# Altium PCB Sound_Sensor_v3.2.PcbDoc (part 3 of 3)
Units mil, origin at the board's own origin, x right, y up, seen from the top; angles counter-clockwise.
Board outline 2755.7 x 2687.13 mil, 2 copper layers (Top Layer, Bottom Layer), stack 57 mil thick; 77 components, 57 nets, 290 pads, 84 vias.
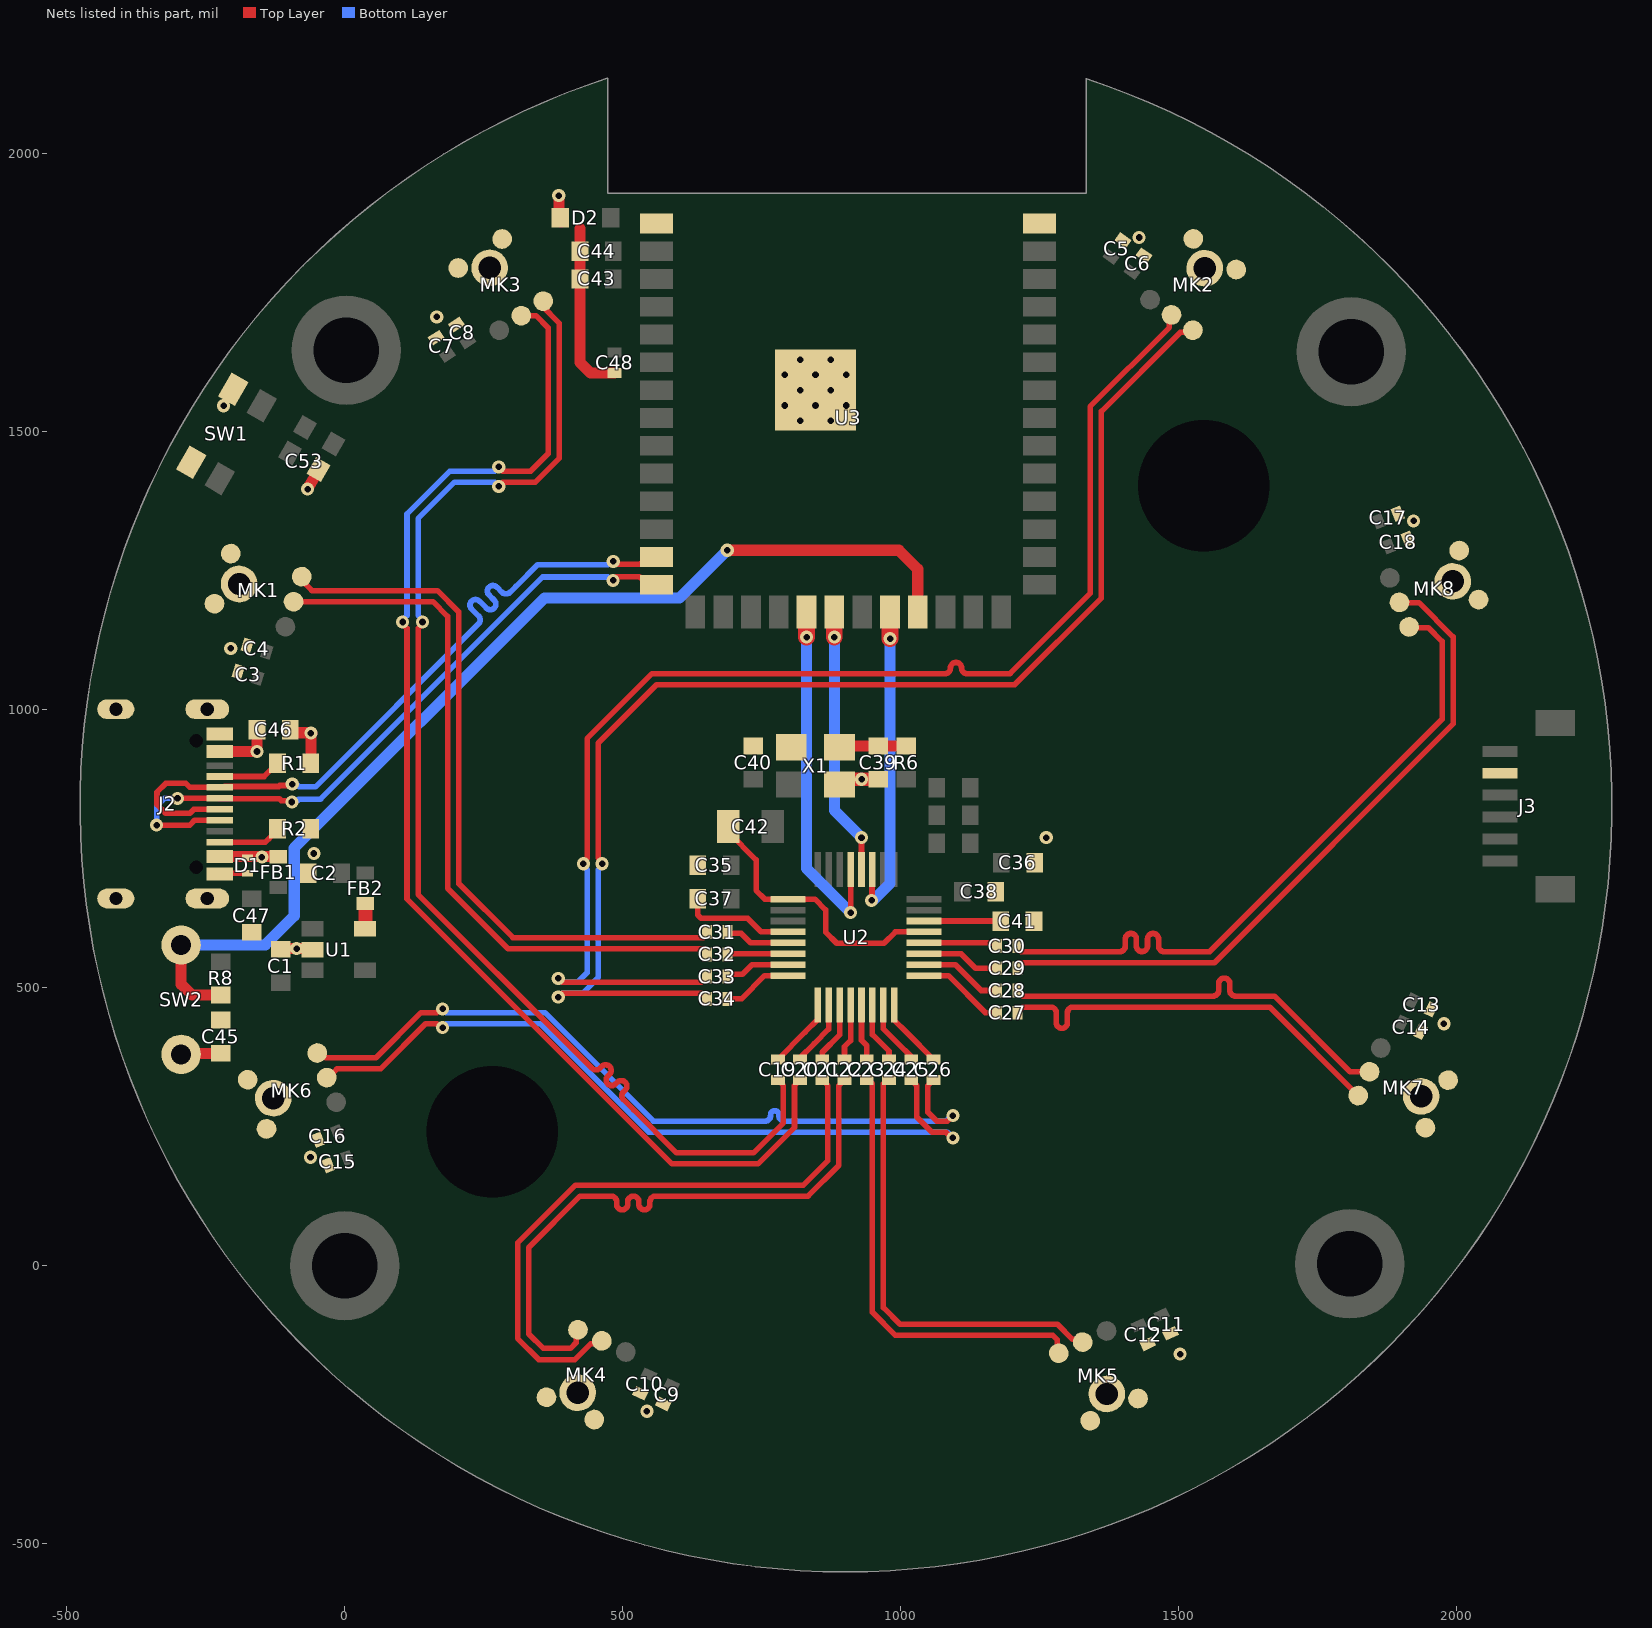
[diagram p2: the nets of this part, all layers, seen from the top]

## Via types
v1: diameter 23.62, hole 11.81, Top Layer to Bottom Layer, 84 vias

## Nets (pads, with @x,y where several pads share a name; then routed paths per layer and width w, separated by ;. In a path a pad name is that pad's centre, name@x,y a point inside that pad or via, vN(x,y) a via of type N, cw(c..) or ccw(c..) an arc to the next point about the centre after c; other vN are vias at no path point) (continued)
GND: C1.2 C2.2 C3.2 C4.2 C5.2 C6.2 C7.2 C8.2 C9.2 C10.2 C11.2 C12.2 C13.2 C14.2 C15.2 C16.2 C17.2 C18.2 C35.2 C36.2 C37.2 C38.2 C39.1 C40.1 C41.2 C42.1 C43.2 C44.2 C45.1 C46.2 C47.2 C48.1 C53.2 D1.1 D2.2 J2.A1/B12 J2.B1/A12 J2.S1 J2.S2 J2.S3 J2.S4 J3.2 MK1.2 MK1.3 MK1.4 MK2.2 MK2.3 MK2.4 MK3.2 MK3.3 MK3.4 MK4.2 MK4.3 MK4.4 MK5.2 MK5.3 MK5.4 MK6.2 MK6.3 MK6.4 MK7.2 MK7.3 MK7.4 MK8.2 MK8.3 MK8.4 R1.1 R2.1 SW1.2 SW2.2 U1.2 U2.13 U2.25 U2.28 U3.1 U3.40 U3.41 X1.2 X1.4 | length 1506.1
  Top Layer w10: J2.B1/A12@-224.87,704.8 -223.45,706.22 D1.1@-175,706.22 ; C47.2@-167.32,599.92 C47.2@-165.04,599.92 ; C1.2@-125,579 C1.2@-115,569 ; R2.1@-71,776 R2.1@-61,786 ; C37.2@635,660 635,630.86 640.86,625 724.55,625 749.16,600.39 U2.28@797.64,600.39 ; C42.1@690,790 690,780 740,730 740,675 755.55,659.45 U2.25@797.64,659.45 845.55,659.45 865,640 865,600 885,580 970,580 990.39,600.39 U2.13@1041.73,600.39 ; U3.41@845,1575 U3.41@846.46,1575
  Top Layer w20: SW2.2@-294.33,380.02 -292.35,382 C45.1@-223,382 ; C1.2@-115,569 -113.52,570.48 v1(-86.7,570.48) -59.89,570.48 U1.2@-57.99,568.58 ; C46.2@-97.95,964.25 -97.95,963.69 -92.95,958.69 -61.69,958.69 v1(-61,958) ; C2.2@-71,711 C2.2@-66,706 ; v1(-67,1397) -50.6,1425.41 C53.2@-47.02,1432 ; R1.1@-61,904 -61,955.02 -59,957.02 v1@-59,958 ; D2.2@382.72,1885 382.72,1883.03 D2.2@388.47,1877.28 ; v1(385,1925) 385.69,1924.31 385.69,1887.03 D2.2@387.72,1885 ; 423,1865.57 C44.2@423,1825 C43.2@423,1775 423,1625 442.28,1605.72 C48.1@485.5,1605.72 ; X1.2@802.15,933.76 X1.2@803.39,932.52
  Top Layer w25: X1.4@890,865.59 899.41,875 v1(929.7,875) C39.1@960,875
  other v1: 543.53,-261.94 1502.81,-159 -61.73,195.1 1977.23,435.21 -55.51,741.51 1262,770 -205.1,1110.58 1922.79,1339.79 819.23,1519.88 874.35,1519.88 -218,1547 791.67,1547.44 846.79,1547.44 901.91,1547.44 819.23,1575 874.35,1575 791.67,1602.56 846.79,1602.56 901.91,1602.56 819.23,1630.12 874.35,1630.12 165.53,1706.94 1428.94,1849.63
GPIO21: C45.2 R8.1 SW2.1 U3.23 | length 1932.9
  Top Layer w20: SW2.1@-294.33,576.87 -294.33,506.33 -275,487 R8.1@-223,487 ; v1(688,1287) 997,1287 1030.71,1253.29 U3.23@1030.71,1175.79
  Bottom Layer w20: SW2.1@-295.27,570.87 SW2.1@-294.33,570.87 ; SW2.1@-294.33,576.87 -143.13,576.87 -91,629 -91,751 359,1201 602,1201 v1(688,1287)
MIC_OUTS.OUT1_N: C32.1 MK1.6 | length 1295
  Top Layer w10: MK1.6@-92.14,1194.52 158.48,1194.52 185,1168 185,679 294,570 508.4,570 645,570 651.5,563.5 C32.1@651.5,560
MIC_OUTS.OUT1_P: C31.1 MK1.1 | length 1294.6
  Top Layer w10: MK1.1@-77.49,1239.6 -77.49,1233.01 -59,1214.52 166.77,1214.52 205,1176.28 205,687.28 302.28,590 508.4,590 573.03,590 645,590 651.5,596.5 C31.1@651.5,600
MIC_OUTS.OUT2_N: C33.1 MK2.6 | length 2361.2
  Top Layer w10: v1(384,516.81) 390.81,510 641.5,510 C33.1@651.5,520 ; v1(429.38,723) 429.38,726.69 436,733.31 436,948.28 552.72,1065 1074.58,1065 1079.58,1065 ccw(c1079.58,1075) 1089.58,1075 1089.58,1075.17 cw(c1099.58,1075.17) 1109.58,1075.17 1109.58,1075 ccw(c1119.58,1075) 1119.58,1065 1167,1065 1196.72,1065 1341,1209.28 1341,1545.27 1483.55,1687.82 1483.55,1706.74 MK2.6@1487.23,1710.42
  Bottom Layer w10: v1(384,516.81) 390.81,510 419,510 436.19,527.19 436.19,712.5 429.38,719.31 v1(429.38,723)
MIC_OUTS.OUT2_P: C34.1 MK2.1 | length 2362.6
  Top Layer w10: v1(384,483.19) 390.81,490 641.5,490 C34.1@651.5,480 ; v1(463,723) 463,726.69 456,733.69 456,940 561,1045 1205,1045 1361,1201 1361,1536.98 1503.23,1679.21 1522.14,1679.21 MK2.1@1525.82,1682.89
  Bottom Layer w10: v1(384,483.19) 390.81,490 427.28,490 456.19,518.9 456.19,712.5 463,719.31 v1(463,723)
MIC_OUTS.OUT3_N: C20.1 MK3.6 | length 2299.1
  Top Layer w10: v1(104,1158) 104,1154.31 111.91,1146.41 111.91,659.81 588.72,183 743.28,183 809,248.72 809,324 C20.1@819,334 ; v1(277,1437) 284.5,1429.5 334.5,1429.5 366,1461 366,1687.03 343.88,1709.15 MK3.6@317.61,1709.15
  Bottom Layer w10: v1(104,1158) 104,1161.69 111.91,1169.59 111.91,1352.19 189.22,1429.5 269.5,1429.5 v1(277,1437)
MIC_OUTS.OUT3_P: C19.1 MK3.1 | length 2293.2
  Top Layer w10: v1(139.81,1158) 139.81,1154.31 131.91,1146.41 131.91,668.09 413.71,386.29 444.8,355.2 ccw(c451.87,362.27) 458.94,355.2 462.14,358.4 cw(c469.21,351.33) 476.28,358.4 cw(c469.21,351.33) 476.28,344.26 473.08,341.06 ccw(c480.15,333.99) 473.08,326.92 ccw(c480.15,333.99) 487.22,326.92 490.42,330.12 cw(c497.49,323.05) 504.57,330.12 cw(c497.49,323.05) 504.57,315.97 501.37,312.78 ccw(c508.44,305.7) 501.37,298.63 519.04,280.96 597,203 735,203 789,257 789,324 C19.1@779,334 ; v1(277,1402) 284.5,1409.5 342.78,1409.5 386,1452.72 386,1695.31 MK3.1@353.55,1727.76
  Bottom Layer w10: v1(139.81,1158) 139.81,1161.69 131.91,1169.59 131.91,1343.91 197.5,1409.5 269.5,1409.5 v1(277,1402)
MIC_OUTS.OUT4_N: C21.1 MK4.6 | length 1121.6
  Top Layer w10: MK4.6@462.46,-135.28 457.59,-140.15 442.85,-140.15 414.04,-168.96 348.96,-168.96 311,-131 311,41 415,145 454,145 825,145 869,189 869,324 C21.1@859,334
MIC_OUTS.OUT4_P: C22.1 MK4.1 | length 1121.1
  Top Layer w10: MK4.1@419.5,-115.25 416.35,-118.4 416.35,-138.37 405.75,-148.96 357.25,-148.96 331,-122.72 331,32.72 423.28,125 454,125 479,125 cw(c479,115) 489,115 489,110.43 ccw(c499,110.43) 509,110.43 509,115 cw(c519,115) 529,115 529,110.43 ccw(c539,110.43) 549,110.43 549,115 cw(c559,115) 559,125 591.42,125 833.28,125 889,180.72 889,324 C22.1@899,334
MIC_OUTS.OUT5_N: C24.1 MK5.6 | length 810.4
  Top Layer w10: C24.1@979,334 975.5,334 969,327.5 969,-75.58 998.82,-105.4 1282.04,-105.4 1309.26,-132.62 1322.54,-132.62 MK5.6@1327.4,-137.49 MK5.6@1316.82,-137.49
MIC_OUTS.OUT5_P: C23.1 MK5.1 | length 802.6
  Top Layer w10: C23.1@939,334 942.5,334 949,327.5 949,-83.86 990.53,-125.4 1273.75,-125.4 1282.03,-133.67 1282.03,-155.1 MK5.1@1284.44,-157.52
MIC_OUTS.OUT6_N: C25.1 MK6.6 | length 1408.4
  Top Layer w10: MK6.6@-32.56,338.32 -29.71,338.32 -13.99,354.04 64.35,354.04 145.5,435.19 165.5,435.19 172.31,428.38 v1(176,428.38) ; C25.1@1019,334 1029,324 1029,267.72 1056.72,240 1081.33,240 1091.33,230 v1(1094,230)
  Bottom Layer w10: v1(176,428.38) 182.81,435.19 351.81,435.19 547,240 1084,240 v1(1094,230)
MIC_OUTS.OUT6_P: C26.1 MK6.1 | length 1411.8
  Top Layer w10: MK6.1@-49.55,382.57 -42.67,382.57 -34.13,374.04 56.07,374.04 137.22,455.19 165.5,455.19 172.31,462 v1(176,462) ; C26.1@1059,334 1049,324 1049,276 1065,260 1084,260 v1(1094,270)
  Bottom Layer w10: v1(176,462) 182.81,455.19 360.1,455.19 555.28,260 738.67,260 756,260 ccw(c756,270) 766,270 766,271.29 cw(c773.5,271.29) 781,271.29 781,270 ccw(c791,270) 791,260 811,260 1081.33,260 1091.33,270 v1(1094,270)
MIC_OUTS.OUT7_N: C28.1 MK7.6 | length 741.5
  Top Layer w10: C28.1@1210,495 1220,485 1557.14,485 1562.15,485 ccw(c1562.15,495) 1572.15,495 1572.15,507.34 cw(c1582.15,507.34) 1592.15,507.34 1592.15,495 ccw(c1602.15,495) 1602.15,485 1621,485 1672.3,485 1808.51,348.79 MK7.6@1843.42,348.79
MIC_OUTS.OUT7_P: C27.1 MK7.1 | length 741.9
  Top Layer w10: C27.1@1210,455 1220,465 1245,465 1270,465 cw(c1270,455) 1280,455 1280,436.95 ccw(c1290,436.95) 1300,436.95 1300,455 cw(c1310,455) 1310,465 1340.08,465 1664.02,465 MK7.1@1823.01,306
MIC_OUTS.OUT8_N: C29.1 MK8.6 | length 1247
  Top Layer w10: C29.1@1210,535 1210,538.5 1216.5,545 1499.05,545 1564.28,545 1994,974.72 1994,1131.28 1932.52,1192.77 1897.88,1192.77 MK8.6@1897.42,1193.22
MIC_OUTS.OUT8_P: C30.1 MK8.1 | length 1249.2
  Top Layer w10: C30.1@1210,575 1210,571.5 1216.5,565 1372.6,565 1394.05,565 ccw(c1394.05,575) 1404.05,575 1404.05,587.55 cw(c1414.05,587.55) 1424.05,587.55 1424.05,575 ccw(c1434.05,575) 1444.05,575 1444.05,587.55 cw(c1454.05,587.55) 1464.05,587.55 1464.05,575 ccw(c1474.05,575) 1474.05,565 1499.05,565 1556,565 1974,983 1974,1123 1949.11,1147.89 1916.03,1147.89 MK8.1@1914.79,1149.12
MISO: U2.20 U3.20 | length 483.4
  Top Layer w10: U2.20@929.53,712.6 v1(929.53,770)
  Top Layer w30: v1(880.71,1130.71) U3.20@880.71,1175.79
  Bottom Layer w20: v1(880.71,1130.71) 880.71,818.82 v1(929.53,770)
MOSI: U2.21 U3.19 | length 650.8
  Top Layer w10: v1(909.84,635.16) U2.21@909.84,712.6
  Top Layer w30: v1(830.71,1130.71) U3.19@830.71,1175.79
  Bottom Layer w20: v1(830.71,1130.71) 830.71,714.29 v1(909.84,635.16)
NetC19_2: C19.2 U2.1 | length 127.2
  Top Layer w10: C19.2@779,371 828,420 850.79,442.79 U2.1@850.79,468.5
NetC20_2: C20.2 U2.2 | length 118.8
  Top Layer w10: C20.2@819,371 819,374 845,400 870.47,425.47 U2.2@870.47,468.5
NetC21_2: C21.2 U2.3 | length 110.4
  Top Layer w10: C21.2@859,371 859,384 890.16,415.16 U2.3@890.16,468.5
NetC22_2: C22.2 U2.4 | length 102
  Top Layer w10: C22.2@899,371 899,394 909.84,404.84 U2.4@909.84,468.5
NetC23_2: C23.2 U2.5 | length 101.4
  Top Layer w10: U2.5@929.53,468.5 929.53,405.47 939,396 C23.2@939,371
NetC24_2: C24.2 U2.6 | length 109.8
  Top Layer w10: U2.6@949.21,468.5 949.21,415.79 979,386 C24.2@979,371
NetC25_2: C25.2 U2.7 | length 118.3
  Top Layer w10: U2.7@968.9,468.5 968.9,426.1 994.5,400.5 1019,376 C25.2@1019,371
NetC26_2: C26.2 U2.8 | length 126.7
  Top Layer w10: U2.8@988.58,468.5 988.58,441.42 1010,420 C26.2@1059,371
NetC27_2: C27.2 U2.9 | length 158.9
  Top Layer w10: U2.9@1041.73,521.65 1085.85,521.65 1152.5,455 C27.2@1173,455
NetC28_2: C28.2 U2.10 | length 150.5
  Top Layer w10: U2.10@1041.73,541.34 1098.66,541.34 1145,495 C28.2@1173,495
NetC29_2: C29.2 U2.11 | length 142
  Top Layer w10: U2.11@1041.73,561.02 1108.98,561.02 1135,535 C29.2@1173,535
NetC30_2: C30.2 U2.12 | length 133.6
  Top Layer w10: U2.12@1041.73,580.71 1167.29,580.71 C30.2@1173,575
NetC31_2: C31.2 U2.29 | length 117.1
  Top Layer w10: C31.2@688.5,600 690.65,597.85 713.2,597.85 730.34,580.71 U2.29@797.64,580.71
NetC32_2: C32.2 U2.30 | length 109.6
  Top Layer w10: C32.2@688.5,560 689.52,561.02 U2.30@797.64,561.02
NetC33_2: C33.2 U2.31 | length 118.1
  Top Layer w10: C33.2@688.5,520 688.5,520.2 692.5,524.2 715.48,524.2 732.62,541.34 U2.31@797.64,541.34
NetC34_2: C34.2 U2.32 | length 126.4
  Top Layer w10: C34.2@688.5,480 713.78,480 755.43,521.65 U2.32@797.64,521.65
NetC39_2: C39.2 R6.2 X1.1 | length 124.9
  Top Layer w20: X1.1@890,932.52 cw(c892.48,932.52) 892.48,935 C39.2@960,935 R6.2@1010,935 R6.2@1007.52,937.48
NetFB2_1: FB2.1 U1.5 | length 35.2
  Top Layer w15: U1.5@37,606.49 U1.5@36.5,605.98 U1.5@37.48,605
  Top Layer w25: U1.5@37,606.49 FB2.1@37,639.63
NetJ2_A5: J2.A5 R1.2 | length 115.3
  Top Layer w10: J2.A5@-224.87,879.99 -145.01,879.99 -133.5,891.5 -131,891.5 -121,901.5 R1.2@-121,904
NetJ2_B5: J2.B5 R2.2 | length 115.3
  Top Layer w10: J2.B5@-224.87,761.88 -142.69,761.88 -136.08,768.5 -136,768.5 -121,783.5 R2.2@-121,786
REFIN: C41.1 U2.14 | length 138.3
  Top Layer w10: U2.14@1041.73,620.08 1179.92,620.08 C41.1@1180,620
SCLK: U2.19 U3.22 | length 589.6
  Top Layer w10: v1(947.75,657.25) 948.48,657.98 948.48,711.87 U2.19@949.21,712.6
  Top Layer w30: v1@980.71,1128.3 U3.22@980.71,1175.79
  Bottom Layer w20: v1(947.75,657.25) 948.44,657.94 951.15,657.94 981.01,687.8 v1(981.01,1128.01)
USB.USB_N: J2.A7 J2.B7 U3.13 | length 1331.9
  Top Layer w10: J2.A7@-224.87,820.94 -271.69,820.94 -278.74,813.88 -322.11,813.88 -337.81,829.58 -337.81,851.79 -322.11,867.5 -285.94,867.5 -278.75,860.31 J2.B7@-224.87,860.31 ; J2.B7@-216.4,862 -118.68,862 -116.88,863.8 -97.16,863.8 v1(-94.56,866.41) ; v1(483,1267) 488.36,1261.64 531.28,1261.64 531.92,1262.28 548.31,1262.28 U3.13@561.02,1275
  Bottom Layer w10: v1(-94.56,866.41) -91.95,863.8 -84.42,863.8 -81.89,861.27 -67.75,861.27 -52.84,861.27 237.05,1151.17 240.59,1154.7 ccw(c233.52,1161.77) 240.59,1168.84 228.1,1181.34 cw(c235.17,1188.41) 228.1,1195.48 cw(c235.17,1188.41) 242.24,1195.48 254.73,1182.99 ccw(c261.8,1190.06) 268.87,1182.99 ccw(c261.8,1190.06) 268.87,1197.13 259.42,1206.58 cw(c266.5,1213.65) 259.42,1220.72 cw(c266.5,1213.65) 273.57,1220.72 283.02,1211.27 ccw(c290.09,1218.34) 297.16,1211.27 307.85,1221.96 346.8,1260.91 473.22,1260.91 479.31,1267 v1(483,1267)
USB.USB_P: J2.A6 J2.B6 U3.14 | length 1237.9
  Top Layer w10: v1(-338.46,792.64) -278.77,792.64 -270.16,801.25 J2.B6@-224.87,801.25 ; v1@-301,840.62 J2.A6@-224.87,840.62 ; J2.A6@-224.87,840 -117.52,840 -114.26,836.74 -97.8,836.74 v1(-95.19,834.13) ; v1(482.8,1232.82) 489.62,1239.64 530,1239.64 531.92,1237.72 548.31,1237.72 U3.14@561.02,1225
  Bottom Layer w10: v1(-338.46,792.64) -338.46,826.54 -324.31,840.69 v1(-301,840.69) ; v1(-95.19,834.13) -92.58,836.74 -85.05,836.74 -82.52,839.27 -58.63,839.27 -43.73,839.27 355.91,1238.91 473.02,1238.91 479.11,1232.82 v1(482.8,1232.82)
VBUS: C46.1 D1.2 FB1.1 J2.A4/B9 J2.B4/A9 | length 211.5
  Top Layer w10: J2.B4/A9@-224.87,736.29 J2.B4/A9@-224.73,736.15
  Top Layer w20: J2.A4/B9@-224.87,925.27 -224.74,925.13 -158.09,925.13 v1(-157.95,925) C46.1@-157.95,964.25 ; J2.B4/A9@-224.73,736.15 -120.59,736.15 FB1.1@-120,735.56
  other v1: -149,735.07
pads on no net: J2.A8 J2.B8 J2.MH J3.MP1 J3.MP2 U1.4 U2.27 U3.4 U3.5 U3.6 U3.7 U3.8 U3.9 U3.10 U3.11 U3.12 U3.15 U3.16 U3.24 U3.25 U3.26 U3.28 U3.29 U3.30 U3.31 U3.32 U3.33 U3.34 U3.35 U3.38 U3.39

## Polygon pours and split planes (outlines as drawn)
no net on Bottom Overlay "NONET_L-01_P-001" (solid): 929.91,-91.12 ccw(c1058.2,98.34) 830,115 851.98,112.93 cw(c1058.2,98.34) 955.48,-81.07
no net on Bottom Overlay "NONET_L-01_P-001" (solid): 812.18,246.93 cw(c688.63,-156.04) 1100.18,-65.07 cw(c1461.05,-199.89) 1220.4,100.93 1220.18,101.93 1206.06,221.93 1112.12,121.93 1111.18,120.93 ccw(c301.36,-522.4) 898.68,321.93
GND on Bottom Layer "GND_L02_P002" (solid, remove dead copper, pour order 2): 450,2105.87 ccw(c901.69,827.06) 1355,2105.29 1355,1910 450,1910
GND on Top Layer "GND_L01_P003" (solid, remove dead copper, pour order 3): 451,2105.22 ccw(c902.69,826.41) 1356,2104.65 1356,1910 451,1910

## Other copper
Top Layer:
  rectangle net 3V3: 1114,707.5 1199,878
  rectangle net GND: 1156,658.54 1256,687
  rectangle net \R\E\S\E\T\: 1043,712.6 1080,777.5
  rectangle net 3V3: 2023.07,915.35 2109.78,1074
  region net 3V3: -65.33,1154.59 -118.63,1171.91 -159.92,1044.85 -106.61,1027.53
  rectangle net 3V3: -148.28,1048.18 -101.31,1108.06
  rectangle net GND: 1225,602.5 1298,793
  rectangle net GPIO21: -240.5,427 -205.5,487
  rectangle net 5V: -184.82,644.92 -101,674.92
  region net "DEBUG SIG.ENABLE": -159.19,1494.44 -190.21,1512.35 -236.19,1432.71 -205.17,1414.8
  region net "DEBUG SIG.ENABLE": -48.34,1518.75 -151.75,1578.45 -254.36,1400.72 -150.95,1341.02
  region net GND: 1965.98,214.39 2025.04,338.2 1912.48,391.89 1853.42,268.08
  region net GND: 1985.05,385.36 2012.94,443.83 1957.21,470.41 1929.32,411.94
  region net 3V3: 1872.74,366.87 1929.45,485.76 1877.07,510.74 1820.36,391.86
  region net GND: -22.82,173.67 -46.86,236.3 -87.82,220.58 -63.77,157.95
  region net 3V3: 68.81,207.59 22.19,329.04 -40.97,304.79 5.65,183.35
  region net 3V3: 1477.15,1745.8 1371.17,1821.39 1337.97,1774.84 1443.95,1699.25
  rectangle net 3V3: -21,688.5 53,762
  region net GND: 330.26,-257.59 453.3,-314.96 480.23,-257.21 357.19,-199.83
  region net 3V3: 478.53,-166.95 596.14,-221.79 624.05,-161.94 506.44,-107.1
  region net 3V3: 1362.64,-143.39 1481.22,-88.09 1453.31,-28.24 1334.73,-83.54
  region net 3V3: 1906.05,1228.33 1858.28,1349.59 1790.66,1322.95 1838.43,1201.69
  region net 3V3: 282.96,1707.53 174.95,1636.03 215.06,1575.43 323.08,1646.92
  rectangle net GND: 366.98,1865.57 434,1902.72
  rectangle net GND: -81,688.5 -46,803.5
  rectangle net 5V: -135.75,642 -101,692.25
  rectangle net GND: -235,652.83 -217.75,697
  region net GND: 1468.56,1843.67 1415.16,1881.76 1389.78,1846.17 1443.18,1808.08
  region net GND: 1948.42,1312.27 1923.83,1374.69 1887.36,1360.33 1911.95,1297.91
  region net GND: 1451.63,-178.94 1512.43,-150.59 1494.45,-112.04 1433.65,-140.39
  region net GND: 2042.12,1242.79 2037.07,1255.6 1960.71,1225.52 1965.75,1212.71
  region net GND: 393.84,-259.61 411.43,-267.81 441.1,-204.18 423.51,-195.98
  region net GND: -215.67,1573.1 -281.6,1458.91 -262.36,1447.81 -196.43,1562
  region net "DEBUG SIG.ENABLE": -163.39,1540.22 -229.32,1426.03 -214.72,1417.6 -148.79,1531.79
  rectangle net GND: -235,964.57 -217.75,1003.83
  region net GND: -207.37,1134.8 -228.1,1071 -189.66,1058.51 -168.93,1122.31
  region net GND: 507.53,-258.94 566.08,-286.25 583.08,-249.79 524.53,-222.49
  region net GND: 1335.97,-318.63 1460.3,-260.66 1407.59,-147.63 1283.27,-205.61
  region net GND: -213.81,342.25 -164.65,214.18 -48.23,258.87 -97.38,386.94
  region net GND: -231.68,1308.39 -272.89,1181.53 -154.29,1142.99 -113.07,1269.85
  region net GND: 2078.1,1191.52 2028.35,1317.83 1951.99,1287.75 2001.74,1161.44
  region net GND: 282.15,1886.94 167.76,1811.23 236.59,1707.23 350.98,1782.94
  region net GND: 180.53,1741.15 128.01,1706.39 159.4,1658.96 211.92,1693.72
  region net GND: 1640.34,1806.83 1528.66,1886.49 1456.77,1785.7 1568.44,1706.04
  rectangle net 5V: -135.75,605.98 -11,667
  rectangle net 5V: -115,494 -11,524.26
Bottom Layer:
  rectangle net VBUS: -234,714 -127,950

## Silkscreen, mask and mechanical layers (free items; w line width, h text height)
Top Overlay:
  lines w5: -202,377.5 -182.5,377.5 -175,385 -175,393 ; -168.34,563 -168.34,579.92 ; -144.62,1053.42 -78.97,1050.85 ; -123,663 -123,649 -101,649 ; -115,490 -115,465 -50,465 ; -103,205 -106.88,214.7 -63.37,231.6 ; -54,685 -18,685 ; -54,727 -40,727 -18,727 ; -53.33,807 -54,807 -54,837 -4,837 ; -46,131 -18,142 -26.6,164.64 ; -27,730 -27,775 -7,775 ; 350,1860 350,1825 404,1825 ; 427.5,1914 427.5,1938 ; 490,1735 490,1754 ; 596,667 616,667 616,660 ; 613,608 639,608 639,600 ; 624,556 639,556 639,560 ; 627,514 639,514 639,520 ; 660,855 685,855 685,824 686,824 ; 701,480 723,480 723,457 ; 731,309 731,331.5 763,331.5 ; 859,321.5 861,321.5 861,193 ; 939,321.5 941,321.5 941,193 ; 1026.08,305 1026.08,321.5 ; 1058,321.5 1059,321.5 ; 1075,331.5 1106,331.5 ; 1129.08,881 1130,881 1130,895 1160,895 ; 1143,768.52 1160,768.52 ; 1143,822.39 1159,822.39 ; 1222.5,530 1360,530 ; 1222.5,566.34 1222.5,565 1237,565
  lines w10: 2005,629.3 2235,629.3 2235,1023 2005,1023 2005,629.3
  text "USB" at -405.98,1031.47 h90
  text "DEBUG" at 1995.4,674.3 h90 r90
Bottom Overlay:
  lines w5: 1111.18,120.93 ccw(c301.36,-522.4) 898.68,321.93 812.18,246.93 cw(c688.63,-156.04) 1100.18,-65.07 cw(c1461.05,-199.89) 1220.4,100.93 ; 1112.12,121.93 1206.06,221.93 1220.18,101.93 ; 830,115 cw(c1058.2,98.34) 929.91,-91.12 955.48,-81.07 ccw(c1058.2,98.34) 851.98,112.93 830,115
  text "RoHS" at 981.68,12.97 h236.22
  text "compliant" at 978.68,-68.26 h125.98
  text "ZERO CARBON FOOTPRINT" at 1324.68,-192.07 h40
  text "Sound_Sensor_v3.2" at 1249,-257 h40
DIMENSION:
  lines w5: -885,1793 -217.85,1801.54 -88.9,1705.92 ; -118.08,1705.92 -88.9,1705.92 ; -97.88,1733.72 -88.9,1705.92
  text "Mounting Hole" at -2378.28,1920.59 h236.22
  text "Dia 3.0 (mm)" at -2197.38,1753.62 h118.11
  text "PCB Diameter" at -2378.28,262.59 h236.22
BOARD OUTLINE:
  the board outline again, w10
FABRICATION:
  drawing of 416 lines, arcs and shapes, not listed
  text "Layer" at 3239.58,3283.09 h60
  text "Name" at 3649.49,3283.09 h60
  text "Material" at 4579.23,3283.09 h60
  text "Thickness" at 5439,3283.09 h60
  text "Constant" at 6088.83,3283.09 h60
  text "Board Layer Stack" at 6658.7,3283.09 h60
  text "Top Overlay" at 3649.49,3163.09 h60
  text "Top Solder" at 3649.49,3043.09 h60
  text "Solder Resist" at 4579.23,3043.09 h60
  text "3.00mil" at 5439,3043.09 h60
  text "3.5" at 6088.83,3043.09 h60
  text "1" at 3239.58,2923.09 h60
  text "Top Layer" at 3649.49,2923.09 h60
  text "10.00mil" at 5439,2923.09 h60
  text "Dielectric 1" at 3649.49,2803.09 h60
  text "FR-4" at 4579.23,2803.09 h60
  text "37.00mil" at 5439,2803.09 h60
  text "4.8" at 6088.83,2803.09 h60
  text "2" at 3239.58,2683.09 h60
  text "Bottom Layer" at 3649.49,2683.09 h60
  text "10.00mil" at 5439,2683.09 h60
  text "Bottom Solder" at 3649.49,2563.09 h60
  text "Solder Resist" at 4579.23,2563.09 h60
  text "3.00mil" at 5439,2563.09 h60
  text "3.5" at 6088.83,2563.09 h60
  text "Bottom Overlay" at 3649.49,2443.09 h60
Drill Drawing:
  circle w10: c-1355.38,4135.27 r33.33
  lines w10: -1388.71,3968.61 -1372.04,3968.61 -1372.04,3951.94 -1338.71,3951.94 -1338.71,3968.61 -1322.04,3968.61 -1322.04,4001.94 -1338.71,4001.94 -1338.71,4018.61 -1372.04,4018.61 -1372.04,4001.94 -1388.71,4001.94 -1388.71,3968.61 ; -1388.71,4251.94 -1322.04,4251.94 -1322.04,4318.61 -1388.71,4318.61 -1388.71,4251.94 ; -1388.71,4468.61 -1322.04,4468.61 -1355.38,4401.94 -1388.71,4468.61 ; -1388.71,4551.94 -1355.38,4568.61 -1322.04,4551.94 -1338.71,4585.27 -1322.04,4618.61 -1355.38,4601.94 -1388.71,4618.61 -1372.04,4585.27 -1388.71,4551.94 ; -1388.71,4701.94 -1388.71,4718.61 -1372.04,4735.27 -1388.71,4751.94 -1388.71,4768.61 -1372.04,4768.61 -1355.38,4751.94 -1338.71,4768.61 -1322.04,4768.61 -1322.04,4751.94 -1338.71,4735.27 -1322.04,4718.61 -1322.04,4701.94 -1338.71,4701.94 -1355.38,4718.61 -1372.04,4701.94 -1388.71,4701.94 ; -1388.71,4885.27 -1355.38,4851.94 -1322.04,4885.27 -1355.38,4918.61 -1388.71,4885.27 ; -1388.71,5001.94 -1322.04,5001.94 -1322.04,5068.61 -1388.71,5068.61 -1388.71,5001.94 ; -1375.38,5015.27 -1335.38,5015.27 -1335.38,5055.27 -1375.38,5055.27 -1375.38,5015.27
  lines w15: -1448.5,3906.94 12079.68,3906.94 ; -1448.5,5106.94 12079.68,5106.94 ; -897.62,3756.94 -897.62,5256.94 ; -307.78,3756.94 -307.78,5256.94 ; 851.88,3756.94 851.88,5256.94 ; 1357.76,3756.94 1357.76,5256.94 ; 2091.56,3756.94 2091.56,5256.94 ; 3591.11,3756.94 3591.11,5256.94 ; 4180.96,3756.94 4180.96,5256.94 ; 4926.76,3756.94 4926.76,5256.94 ; 6066.42,3756.94 6066.42,5256.94 ; 6920.19,3756.94 6920.19,5256.94 ; 8253.79,3756.94 8253.79,5256.94 ; 9587.4,3756.94 9587.4,5256.94 ; 10677.08,3756.94 10677.08,5256.94 ; -1448.5,3756.94 12079.68,3756.94 12079.68,5256.94 -1448.5,5256.94 -1448.5,3756.94
  text "Symbol" at -1358.5,5151.94 h72
  text "Count" at -852.62,5151.94 h72
  text "Hole Size" at -262.78,5151.94 h72
  text "Plated" at 896.88,5151.94 h72
  text "Hole Type" at 1402.76,5151.94 h72
  text "Drill Layer Pair" at 2136.56,5151.94 h72
  text "Via/Pad" at 3636.11,5151.94 h72
  text "Pad Shape" at 4225.96,5151.94 h72
  text "Template" at 4971.76,5151.94 h72
  text "Description" at 6111.42,5151.94 h72
  text "Hole Tolerance (+)" at 6965.19,5151.94 h72
  text "Hole Tolerance (-)" at 8298.79,5151.94 h72
  text "Hole Length" at 9632.4,5151.94 h72
  text "Routed Path Length" at 10722.08,5151.94 h72
  text "2" at -852.62,5001.94 h60
  text "23.62mil (0.600mm)" at -262.78,5001.94 h60
  text "PTH" at 896.88,5001.94 h60
  text "Slot" at 1402.76,5001.94 h60
  text "Top Layer - Bottom Layer" at 2136.56,5001.94 h60
  text "Pad" at 3636.11,5001.94 h60
  text "Rounded" at 4225.96,5001.94 h60
  text "r90_170h60_140r100" at 4971.76,5001.94 h60
  text "55.12mil (1.400mm)" at 9632.4,5001.94 h60
  text "31.50mil (0.800mm)" at 10722.08,5001.94 h60
  text "2" at -852.62,4851.94 h60
  text "23.62mil (0.600mm)" at -262.78,4851.94 h60
  text "PTH" at 896.88,4851.94 h60
  text "Slot" at 1402.76,4851.94 h60
  text "Top Layer - Bottom Layer" at 2136.56,4851.94 h60
  text "Pad" at 3636.11,4851.94 h60
  text "Rounded" at 4225.96,4851.94 h60
  text "(Mixed)" at 4971.76,4851.94 h60
  text "66.93mil (1.700mm)" at 9632.4,4851.94 h60
  text "43.31mil (1.100mm)" at 10722.08,4851.94 h60
  text "2" at -852.62,4701.94 h60
  text "24.41mil (0.620mm)" at -262.78,4701.94 h60
  text "NPTH" at 896.88,4701.94 h60
  text "Round" at 1402.76,4701.94 h60
  text "Top Layer - Bottom Layer" at 2136.56,4701.94 h60
  text "Pad" at 3636.11,4701.94 h60
  text "Rounded" at 4225.96,4701.94 h60
  text "c0hn62" at 4971.76,4701.94 h60
  text "-" at 9632.4,4701.94 h60
  text "-" at 10722.08,4701.94 h60
  text "2" at -852.62,4551.94 h60
  text "36.22mil (0.920mm)" at -262.78,4551.94 h60
  text "PTH" at 896.88,4551.94 h60
  text "Round" at 1402.76,4551.94 h60
  text "Top Layer - Bottom Layer" at 2136.56,4551.94 h60
  text "Pad" at 3636.11,4551.94 h60
  text "Rounded" at 4225.96,4551.94 h60
  text "c180h92" at 4971.76,4551.94 h60
  text "-" at 9632.4,4551.94 h60
  text "-" at 10722.08,4551.94 h60
  text "2" at -852.62,4401.94 h60
  text "236.22mil (6.000mm)" at -262.78,4401.94 h60
  text "PTH" at 896.88,4401.94 h60
  text "Round" at 1402.76,4401.94 h60
  text "Top Layer - Bottom Layer" at 2136.56,4401.94 h60
  text "Pad" at 3636.11,4401.94 h60
  text "Rounded" at 4225.96,4401.94 h60
  text "c0h600" at 4971.76,4401.94 h60
  text "-" at 9632.4,4401.94 h60
  text "-" at 10722.08,4401.94 h60
  text "4" at -852.62,4251.94 h60
  text "118.11mil (3.000mm)" at -262.78,4251.94 h60
  text "PTH" at 896.88,4251.94 h60
  text "Round" at 1402.76,4251.94 h60
  text "Top Layer - Bottom Layer" at 2136.56,4251.94 h60
  text "Pad" at 3636.11,4251.94 h60
  text "Rounded" at 4225.96,4251.94 h60
  text "c500h300" at 4971.76,4251.94 h60
  text "-" at 9632.4,4251.94 h60
  text "-" at 10722.08,4251.94 h60
  text "8" at -852.62,4101.94 h60
  text "40.35mil (1.025mm)" at -262.78,4101.94 h60
  text "PTH" at 896.88,4101.94 h60
  text "Round" at 1402.76,4101.94 h60
  text "Top Layer - Bottom Layer" at 2136.56,4101.94 h60
  text "Pad" at 3636.11,4101.94 h60
  text "Rounded" at 4225.96,4101.94 h60
  text "c168h102x0" at 4971.76,4101.94 h60
  text "-" at 9632.4,4101.94 h60
  text "-" at 10722.08,4101.94 h60
  text "84" at -852.62,3951.94 h60
  text "11.81mil (0.300mm)" at -262.78,3951.94 h60
  text "PTH" at 896.88,3951.94 h60
  text "Round" at 1402.76,3951.94 h60
  text "Top Layer - Bottom Layer" at 2136.56,3951.94 h60
  text "Via" at 3636.11,3951.94 h60
  text "Rounded" at 4225.96,3951.94 h60
  text "v60h30" at 4971.76,3951.94 h60
  text "-" at 9632.4,3951.94 h60
  text "-" at 10722.08,3951.94 h60
  text "106 Total" at -852.62,3801.94 h60
  text "Slot definitions :" at -1358.5,3656.97 h60
  text "Routed Path Length" at -325.81,3656.97 h60
  text "= Calculated from tool start centre position to tool end centre position." at 776.86,3656.97 h60
  text "Hole Length" at -325.81,3556.99 h60
  text "= Routed Path Length + Tool Size = Slot length as defined in the PCB layout" at 366.99,3556.99 h60

## Dimensions
0,0 to 1808,3.15 on DIMENSION
1810.69,1643.91 to 1808,3.15 on DIMENSION
901.69,827.06 to -323.66,-398.29 on DIMENSION

## Text inside footprints (layer, text, board x,y; h text height)
J2: Top Overlay "Board Edge" at -407.54,965.76 h28 r270
SW2: Top Overlay "PCB Edge" at -371.05,542.72 h19.68 r270